# Altium PCB PROC106B_ASCII.PcbDoc (part 5 of 8)
Units mil, origin at the board's own origin, x right, y up, seen from the top; angles counter-clockwise.
Board outline 4498.18 x 1060.53 mil, 8 copper layers (Top Layer, GND1, Sig1, PWR1, PWR2, Sig2, GND2, Bottom Layer), stack 69.602 mil thick; 439 components, 327 nets, 1548 pads, 843 vias.
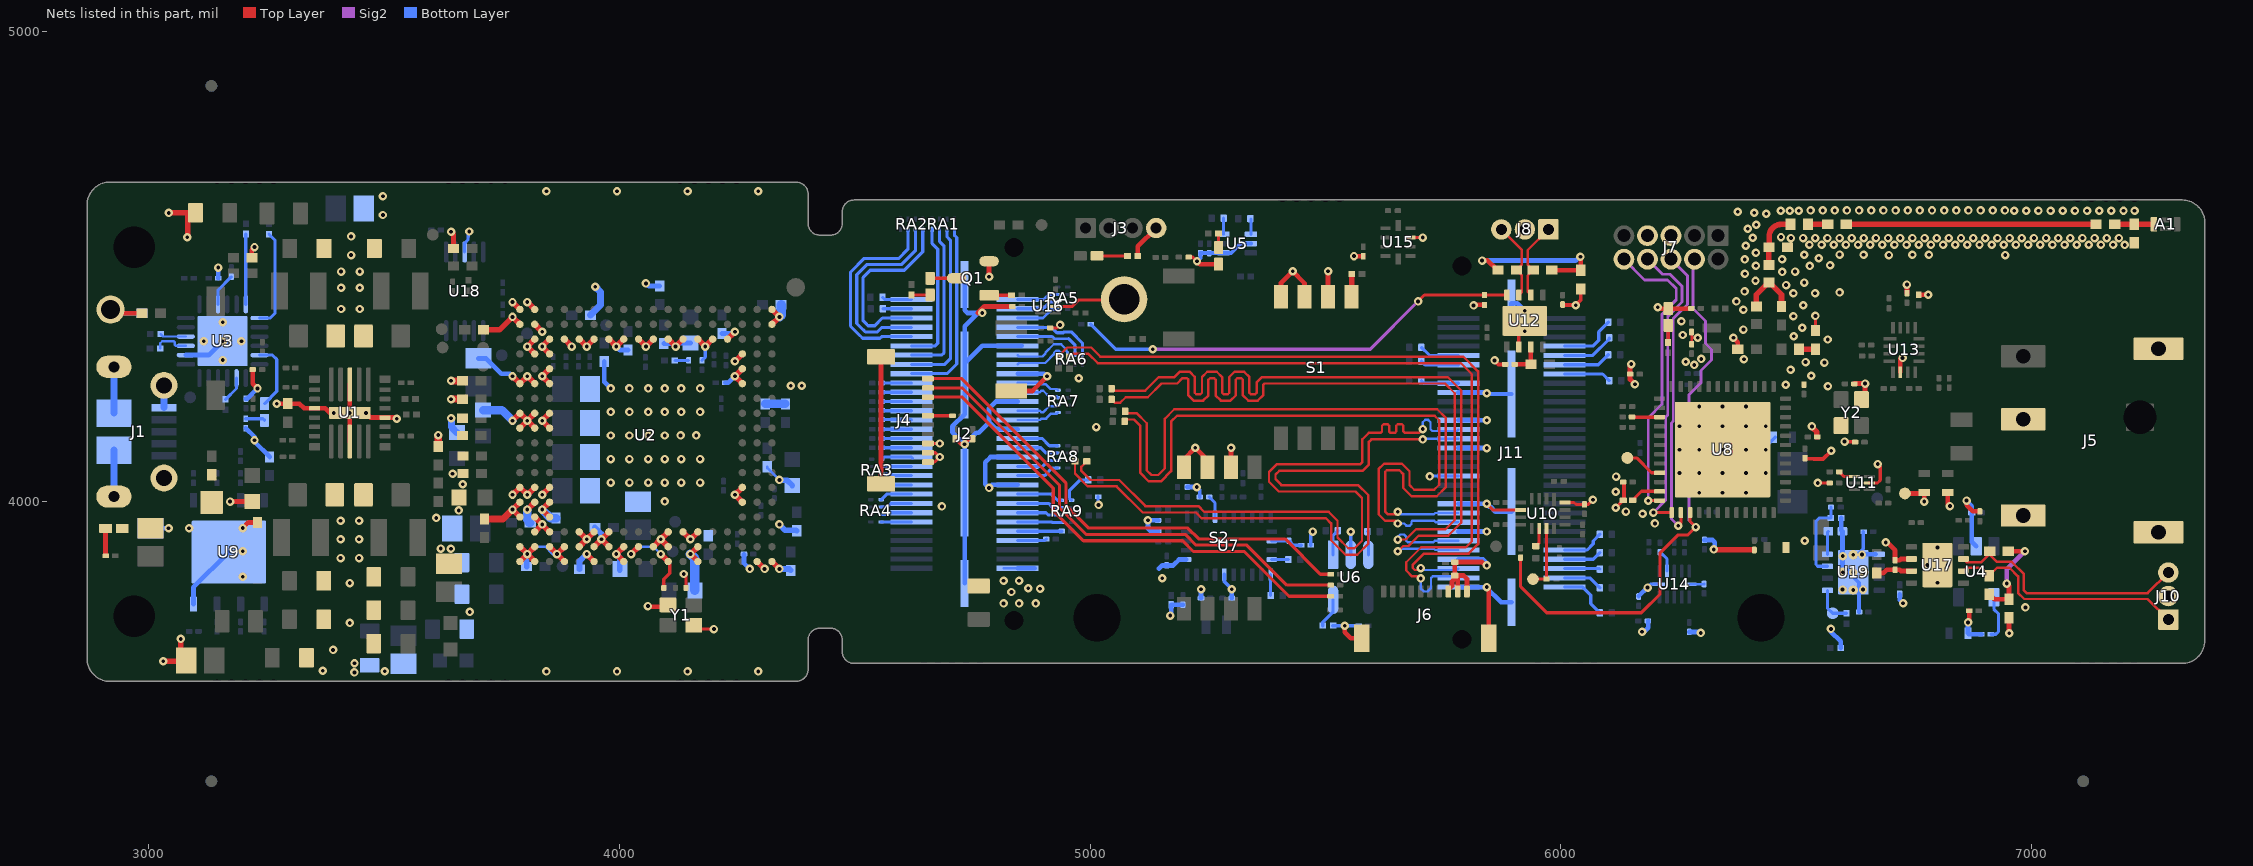
[diagram p11: the nets of this part, all layers, seen from the top]

## Via types
v1: diameter 18, hole 8, Top Layer to Bottom Layer, tented both sides, 804 vias
v2: diameter 19.68, hole 7.87, Top Layer to Bottom Layer, tented both sides, 34 vias
v3: diameter 20, hole 10, Top Layer to Bottom Layer, tented both sides, 3 vias
v4: diameter 18, hole 8, Top Layer to Bottom Layer, 1 vias
v5: diameter 17, hole 7.87, Top Layer to Bottom Layer, 1 vias

## Nets (pads, with @x,y where several pads share a name; then routed paths per layer and width w, separated by ;. In a path a pad name is that pad's centre, name@x,y a point inside that pad or via, vN(x,y) a via of type N, cw(c..) or ccw(c..) an arc to the next point about the centre after c; other vN are vias at no path point) (continued)
GND: C1.1 C2.2 C3.2 C4.2 C5.2 C6.1 C7.2 C8.2 C9.1 C10.1 C11.2 C12.1 C13.1 C14.2 C15.2 C16.2 C17.2 C18.2 C19.2 C20.2 C21.1 C23.2 C24.2 C25.2 C26.2 C27.2 C28.2 C29.2 C30.2 C31.2 C32.2 C33.1 C34.1 C35.2 C36.2 C37.2 C38.2 C39.2 C40.2 C41.2 C42.1 C43.1 C44.1 C45.1 C46.1 C47.1 C48.1 C49.1 C50.2 C51.2 C52.2 C53.2 C54.1 C55.2 C56.2 C57.2 C58.2 C59.2 C60.2 C61.2 C62.2 C63.2 C64.2 C65.2 C66.2 C67.2 C68.2 C69.2 C70.2 C71.2 C72.1 C73.1 C74.2 C75.1 C76.2 C77.1 C78.2 C79.2 C80.2 C81.2 C82.2 C83.2 C84.2 C85.2 C86.2 C87.2 C88.2 C89.2 C90.2 C91.1 C92.1 C94.2 C95.2 C96.2 C97.2 C98.2 C100.1 C101.1 C102.2 C103.2 C104.2 C105.1 C106.1 C107.2 C108.1 C109.1 C110.1 C111.1 C112.2 C113.2 C114.1 C115.2 C116.2 C117.2 C118.2 C119.2 C120.2 C121.2 C122.2 C123.2 C124.1 C125.2 C126.1 C127.2 C128.2 C129.2 C130.1 C131.1 J1.5 J1.6 J1.7 J1.8 J1.9 J1.10 J1.11 J2.20 J2.26 J2.32 J2.38 J2.44 J2.50 J2.MP1 J2.MP2 J2.MP3 J2.MP4 J3.4 J4.8 J4.9 J4.10 J4.11 J4.12 J5.2 J5.3 J5.4 J5.5 J6.8 J6.9 J6.10 J6.11 J6.12 J7.5 J7.7 J8.2 J10.2 J11.18 J11.24 J11.30 J11.36 J11.42 J11.48 J11.54 J11.60 J11.MP1 J11.MP2 J11.MP3 J11.MP4 LD1.2 LD2.2 LD6.2 Q1.2 R3.2 R15.1 R24.1 R29.1 R37.1 R42.2 R52.1 R65.1 R69.1 R73.1 R92.2 R93.2 R96.2 R98.2 R122.2 R125.1 R134.2 R141.2 R158.1 R170.1 R172.1 R180.1 S1.6 S1.7 S1.8 S2.6 S2.7 S2.8 SW2.2 TP12.1 TP15.1 TP20.1 U1.4 U1.11 U1.17 U1.24 U1.27 U2.A1 U2.A2 U2.A6 U2.A8 U2.A11 U2.A13 U2.A15 U2.A17 U2.A18 U2.B6 U2.B8 U2.B9 U2.B10 U2.B11 U2.B12 U2.B13 U2.B14 U2.B15 U2.B16 U2.B17 U2.B18 U2.C6 U2.C7 U2.C8 U2.C12 U2.C13 U2.C14 U2.C16 U2.C17 U2.D16 U2.D17 U2.D18 U2.E3 U2.E16 U2.E17 U2.E18 U2.F3 U2.F16 U2.F17 U2.F18 U2.K16 U2.K17 U2.K18 U2.L16 U2.L17 U2.L18 U2.N3 U2.N16 U2.N17 U2.N18 U2.P3 U2.P16 U2.R3 U2.R16 U2.R17 U2.T4 U2.T5 U2.T6 U2.T7 U2.T8 U2.T9 U2.T10 U2.T11 U2.T12 U2.T13 U2.T14 U2.T15 U2.T16 U2.T17 U2.U1 U2.U17 U2.U18 U2.V1 U2.V17 U2.V18 U3.2 U3.25 U4.2 U5.2 U5.4 U6.2 U7.2 U7.25 U8.49 U9.4 U9.9 U10.6 U10.16 U11.2 U12.2 U12.9@5923.44,4384.46 U13.6 U14.6 U15.3 U16.2 U17.2 U17.9@6799.78,3866 U18.3 U19.5 U19.9@6621.18,3850.46 Y1.2 Y1.4 Y2.2 Y2.4 | length 11299.2
  Top Layer w5.5: C20.2@6277.6,4334.83 6277.6,4349 ; C19.2@6277.6,4361.03 6277.6,4349 ; v1(6290.81,4348.8) 6290.61,4349 6277.6,4349 ; v1@6734.81,4462 v1(6735.03,4461.78) ; v1(6780.09,4440.28) v1@6780.81,4441
  Top Layer w6: C120.2@4915.19,4369.7 4929.78,4369.7 v1(4936.18,4376.1)
  Top Layer w6.7: Y1.4@4159.47,3735.43 4164.9,3730.01 v1(4200.76,3730.01) ; J4.10@4655.33,4084.75 4669.67,4084.75 v1(4680.38,4095.46) 4671.41,4104.44 J4.9@4655.33,4104.44 ; J4.8@4655.33,4124.12 v1(4680.38,4124.12) v1@4680.56,4124.12 ; C16.2@4713.47,4134.05 4725.12,4122.4 v1(4733.36,4122.4) 4744.91,4133.95 C15.2@4750.21,4133.95 ; U16.2@4926.29,4415.28 4962.3,4415.28 4975.97,4428.95 5056.97,4428.95 5056.97,4415.28 TP20.1@5072.16,4430.47 ; R125.1@5209.37,4520.03 5217.97,4520.03 v1(5227,4511) ; U15.3@5680.77,4561.63 v1(5706.58,4561.63) ; v1(5842.34,3996.23) 5842.34,3996.09 5855.35,3983.07 U10.6@5914.31,3983.07 ; U10.16@6008.8,3998.82 6027.93,3998.82 6032.01,3994.74 C117.2@6050.15,3994.74 6058,3994.74 v1(6068,4004.74) ; v1(6116.61,3987.62) C24.2@6132.46,4003.46 ; C21.1@6540.73,4363.78 v1(6540.73,4395.08) ; v1(6545.65,4040.29) C40.2@6571.09,4040.29 ; U11.2@6655.07,4040.29 6672.35,4040.29 6678.29,4046.23 6678.29,4075.35 v1(6673.18,4080.46)
  Top Layer w7: C71.2@4094.48,3817.45 4094.48,3836.09 4106.9,3848.51 4106.9,3867.87 4103.72,3871.04 U2.A8@4103.72,3873.41 ; v1(4136.75,3846.9) 4141.48,3842.17 C14.2@4141.48,3817.27
  Top Layer w8: v1(5299.37,4114.97) v1@5299.37,4116.68 ; v1(5859.11,4300.45) 5867.5,4292.07 C43.1@5881.77,4292.07 ; U12.2@5910.64,4329.34 5910.64,4371.67 U12.9@5923.44,4384.46 ; C105.1@6003.64,4419.31 6004.47,4418.48 6030.47,4418.48 v1(6031.3,4417.65) 6031.3,4417.89 6042.24,4428.83 6042.24,4452.55 C106.1@6042.33,4452.64 ; C26.2@6132.17,4042.21 6132.69,4042.21 6133.86,4041.04 6133.86,4004.87 C24.2@6132.46,4003.46 ; C27.2@6518.42,4093.15 6520.04,4091.53 6536.79,4091.53 6537.06,4091.26 6556.98,4091.26 v1(6574.19,4108.48) ; v1@6602.73,4128.38 v1(6602.58,4128.23) 6603.17,4127.63 6624.26,4127.63 C18.2@6624.86,4127.04
  Top Layer w10: TP12.1@2919.28,4408.64 2927.25,4400.66 C3.2@2986.2,4400.66 ; v1(3173.04,4000.84) C100.1@3220.18,4000.84 ; v1(3200,3944.52) 3211.85,3956.37 C34.1@3231.35,3956.37 ; C32.2@3219.18,4518.49 3219.18,4535.59 v1(3225,4541.42) ; R52.1@3221.07,4281.06 3221.07,4251.35 v1(3231.35,4241.06) ; v1(3272.33,4208.69) C30.2@3295.87,4208.69 3320.4,4208.69 3330.24,4198.85 U1.17@3352.68,4198.85 3375,4198.85 3384.84,4189 v2(3393.23,4189) v2(3427.48,4189) ; U1.24@3427.48,4128.37 v2(3427.48,4189) ; U1.11@3427.48,4249.63 v2(3427.48,4189) ; v1@3526.45,4176.66 3523.96,4179.16 U1.4@3502.28,4179.16 3471.57,4179.16 v2(3461.73,4189) v2(3427.48,4189) ; v1(3642.62,4573.74) 3647.82,4568.54 C31.2@3647.82,4538.34 ; v1@4060.76,3777.29 Y1.2@4095.71,3777.29 ; J4.12@4555.92,4038.49 J4.11@4555.92,4308.18 ; 4761,4401.5 4774.78,4415.28 C72.1@4834.99,4415.28 ; v1(4785.33,4478.19) Q1.2@4785.33,4511.11 ; SW2.2@4832.84,4235.84 4877.59,4235.84 v1(4908.49,4266.74) ; R42.2@5101.31,4522.72 5101.31,4542.78 J3.4@5140.29,4581.75 ; S2.8@5199.37,4073.46 5199.37,4091.17 v1(5223.17,4114.97) 5249.37,4088.77 S2.7@5249.37,4073.46 ; v1(5227,4511) 5232.99,4505.01 LD2.2@5272.84,4505.01 ; S2.6@5299.37,4073.46 v1(5299.37,4114.97) ; S1.8@5405.37,4435.46 5405.37,4465 v1(5430.18,4489.81) 5455.37,4464.63 S1.7@5455.37,4435.46 ; S1.6@5505.37,4435.46 v1(5505.37,4489.81) ; v1(5540.97,3737.11) 5540.97,3723.65 5553.97,3710.65 J6.11@5577.06,3710.65 ; v1(5560.49,4522.26) 5560.83,4521.92 C123.2@5580.17,4521.92 ; J6.8@5761.12,3807.06 5761.12,3813.95 5768.6,3821.44 5768.6,3830.62 5772.77,3834.78 5772.77,3842.77 5773.74,3843.74 C116.2@5774.59,3843.74 ; J6.9@5780.8,3807.06 C116.2@5780.8,3839.39 ; J6.10@5800.49,3810.06 5800.49,3837.09 5793.83,3843.74 5775.3,3843.74 5774.59,3844.45 C115.2@5774.59,3872.2 5833.16,3872.2 5840.17,3865.19 v1(5842.34,3865.19) ; v1(5814.53,4417.41) 5815.67,4418.54 R122.2@5837.64,4418.54 ; v1(5842.34,3819.07) 5846.75,3814.66 J6.12@5846.75,3710.65 ; v1@6146.94,4292 6146.94,4260.11 v1(6157.15,4249.9) ; v1@6206.35,4410.55 LD6.2@6227.85,4410.55 C37.2@6277.18,4410.55 ; v1(6366.4,4348.67) 6375.72,4339.35 C23.2@6375.72,4324.42 ; C17.2@6623.34,4250.88 6623.85,4251.39 6646.11,4251.39 6646.11,4217.48 Y2.4@6646.03,4217.41 ; v1(6689.81,3914) 6693.4,3914 6709.78,3897.62 C108.1@6709.78,3876.02 6719.78,3876 6722.58,3878.8 U17.2@6744.66,3878.8 ; U13.6@6721.06,4275.51 v1@6721.06,4299.75 ; TP15.1@6730.81,4018 6769.81,4018 C122.2@6771.81,4020 v1(6771.81,4000.83) ; C107.2@6735.03,4443.23 v1(6735.03,4461.78) ; R141.2@6760.03,4440.28 v1(6780.09,4440.28) ; C42.1@6821.81,4020 6821.81,3995.69 v1(6826.37,3991.13) ; v1(6861.81,4003) 6861.81,3993.07 6874.85,3980.03 R134.2@6889.73,3980.03 ; v1(6864.78,3744.15) 6867.4,3746.77 C109.1@6867.4,3768.9 ; C110.1@6951.81,3753.93 6951.81,3721.5 v1(6952.41,3720.9) ; v1@6986.5,3776.31 v1(6986.81,3776) ; v1@6721.06,4299.75 6721.06,4304.25 6720.81,4304 6720.81,4300 v1@6721.06,4299.75
  Top Layer w12: v1(3031.17,3661.73) 3068.28,3661.73 v1(3068.28,3709.04) ; v1(3043,4614) 3082.85,4614 3082.85,4566.15 3083,4566 3083,4563 v1(3082,4562) ; C126.1@3721.06,4365.53 3745.45,4365.53 v1(3773.02,4393.1) U2.U18@3788.76,4377.35 ; v1(3773.02,4015.14) U2.F18@3788.76,4030.89 v1(3804.51,4015.14) U2.F17@3820.26,4030.89 ; v1(3773.02,4172.62) U2.L18@3788.76,4188.37 v1(3804.51,4172.62) ; v1(3773.02,4267.11) U2.N18@3788.76,4251.36 v1(3804.51,4267.11) U2.N17@3820.26,4251.36 ; v1(3773.02,4424.59) U2.V18@3788.76,4408.84 ; U2.A18@3788.76,3873.41 v1(3804.51,3889.16) ; U2.B18@3788.76,3904.91 v1(3804.51,3889.16) ; U2.D18@3788.76,3967.9 v1(3773.02,3983.65) U2.E18@3788.76,3999.4 ; U2.K18@3788.76,4156.88 v1(3804.51,4172.62) ; v1(3804.51,3983.65) U2.E17@3820.26,3999.4 ; v1(3804.51,4424.59) U2.V17@3820.26,4408.84 ; U2.A17@3820.26,3873.41 v1(3804.51,3889.16) ; U2.B17@3820.26,3904.91 v1(3804.51,3889.16) ; U2.C17@3820.26,3936.4 v1(3836.01,3952.15) ; U2.D17@3820.26,3967.9 v1(3836.01,3952.15) ; U2.K17@3820.26,4156.88 v1(3804.51,4172.62) ; U2.L17@3820.26,4188.37 v1(3804.51,4172.62) ; U2.R17@3820.26,4314.36 v1(3804.51,4330.1) U2.T17@3820.26,4345.85 ; U2.U17@3820.26,4377.35 v1(3836.01,4361.6) ; v1(3836.01,4015.14) U2.F16@3851.76,4030.89 ; U2.B16@3851.76,3904.91 v1(3867.5,3889.16) ; U2.C16@3851.76,3936.4 v1(3836.01,3952.15) ; U2.D16@3851.76,3967.9 v1(3836.01,3983.65) U2.E16@3851.76,3999.4 ; U2.K16@3851.76,4156.88 v1(3836.01,4172.62) U2.L16@3851.76,4188.37 ; U2.N16@3851.76,4251.36 v1(3836.01,4267.11) U2.P16@3851.76,4282.86 ; U2.R16@3851.76,4314.36 v1(3836.01,4330.1) U2.T16@3851.76,4345.85 ; U2.A15@3883.25,3873.41 v1(3867.5,3889.16) ; U2.B15@3883.25,3904.91 v1(3867.5,3889.16) ; U2.T15@3883.25,4345.85 v1(3899,4330.1) ; U2.B14@3914.75,3904.91 v1(3930.5,3920.65) ; U2.C14@3914.75,3936.4 v1(3930.5,3920.65) ; U2.T14@3914.75,4345.85 v1(3930.5,4330.1) U2.T13@3946.24,4345.85 ; v1(3930.5,3889.16) U2.A13@3946.24,3873.41 ; U2.B13@3946.24,3904.91 v1(3961.99,3920.65) ; U2.C13@3946.24,3936.4 v1(3930.5,3920.65) ; U2.B12@3977.74,3904.91 v1(3961.99,3920.65) ; U2.C12@3977.74,3936.4 v1(3961.99,3920.65) ; U2.T12@3977.74,4345.85 v1(3993.49,4330.1) U2.T11@4009.24,4345.85 ; U2.A11@4009.24,3873.41 v1(3993.49,3889.16) U2.B11@4009.24,3904.91 ; v1(4024.98,3889.16) U2.B10@4040.73,3904.91 ; U2.T10@4040.73,4345.85 v1(4056.48,4330.1) U2.T9@4072.23,4345.85 ; U2.B9@4072.23,3904.91 v1(4087.98,3920.65) ; v1(4087.98,3889.16) U2.A8@4103.72,3873.41 ; U2.B8@4103.72,3904.91 v1(4087.98,3920.65) ; U2.C8@4103.72,3936.4 v1(4087.98,3920.65) ; U2.T8@4103.72,4345.85 v1(4119.47,4330.1) U2.T7@4135.22,4345.85 ; U2.C7@4135.22,3936.4 v1(4150.97,3920.65) U2.C6@4166.72,3936.4 ; U2.A6@4166.72,3873.41 v1(4150.97,3889.16) U2.B6@4166.72,3904.91 ; U2.T6@4166.72,4345.85 v1(4182.46,4330.1) U2.T5@4198.21,4345.85 ; U2.T4@4229.71,4345.85 v1@4243.33,4359.47 ; v1(4245.46,4298.61) U2.R3@4261.2,4314.36 ; U2.E3@4261.2,3999.4 v1(4245.46,4015.14) U2.F3@4261.2,4030.89 ; U2.N3@4261.2,4251.36 v1(4245.46,4267.11) U2.P3@4261.2,4282.86 ; U2.A2@4292.7,3873.41 v1(4308.45,3857.66) ; U2.A1@4324.2,3873.41 v1(4339.94,3857.66) ; U2.U1@4324.2,4377.35 v1(4339.94,4393.1) U2.V1@4324.2,4408.84 ; J4.12@4543.2,4038.49 J4.12@4555.92,4038.49 ; v1(6324.59,3899.2) 6325.24,3898.55 6410.19,3898.55 C86.2@6410.84,3897.89 ; v1(6533.31,4160.3) 6533.31,4158.68 6543.7,4148.29 6543.7,4139.05 6544.53,4138.22 C35.2@6544.67,4138.22
  Top Layer w15: v1(3615.23,4141.98) 3615.31,4141.9 3615.31,4118.19 C33.1@3615.39,4118.11 ; v1(3642.62,4218.19) C58.2@3666.49,4218.19 ; v1(3642.62,4257.19) C57.2@3666.49,4257.19 ; C68.2@3713.57,3963.48 3752.84,3963.48 v1(3773.02,3983.65)
  Bottom Layer w5: v1(3804.51,3889.16) 3820.26,3904.91 3842.53,3904.91 3858.28,3889.16 v1(3867.5,3889.16) ; v1(4024.98,3889.16) 4040.73,3904.91 4072.23,3904.91 v1(4087.98,3889.16)
  Bottom Layer w5.5: C87.2@4314.32,4072.27 C87.2@4314.32,4074.75 ; v1@5840.84,4232.45 v1@5842.34,4230.95
  Bottom Layer w6: C87.2@4314.32,4072.27 v1(4339.95,4046.64) ; v1(6184.15,3818.17) 6184.15,3819.17 6190.34,3825.36 U14.6@6209.55,3825.36
  Bottom Layer w6.7: U18.3@3671.35,4530.99 3671.35,4549.56 3678.49,4556.7 3678.49,4562.64 3679.19,4563.34 3679.19,4572.25 v1(3681.35,4574.41) ; R158.1@4175.56,4300.76 4182.46,4307.66 v1(4182.46,4330.1) ; R37.1@5017.05,4011.07 5017.05,3994.49 v1(5017.88,3993.66) ; v1(5721.24,4054.26) 5722.26,4055.29 J11.36@5782.32,4055.29
  Bottom Layer w8: v1(5226.66,4031.52) 5232.92,4025.26 C13.1@5232.92,4010.48 ; v1(5227,4511) 5234.38,4518.38 C6.1@5234.38,4528.69 C125.2@5252.95,4528.69 5282.89,4528.69 U5.4@5283.23,4529.03 5299.56,4529.03 5319.24,4548.71 U5.2@5341.5,4548.71 ; U7.25@5285.04,3845.7 5285.04,3830.71 v1(5301.01,3814.73) ; R73.1@5468.87,3908 5468.87,3932.94 v1(5472.93,3937) ; R69.1@5516.13,3737.11 v1(5540.97,3737.11) C12.1@5570.91,3737.11 ; U6.2@5553.54,3887.87 v1@5553.54,3935.9 ; v1(5842.34,4230.94) 5843.78,4229.5 J11.MP2@5895.12,4229.5 ; v2(6434.91,4111.11) 6434.91,4117.1 C29.2@6455.28,4137.46 ; U19.9@6611.18,3850.46 6633.26,3828.38 C128.2@6633.26,3766.12 ; U19.9@6630.43,3888.85 6642.17,3900.59 C127.2@6642.17,3936.75
  Bottom Layer w10: TP12.1@2919.28,4408.64 2927.25,4400.66 C2.2@2986.2,4400.66 ; C4.2@3004.01,3943.79 3042.5,3943.79 v1(3042.55,3943.85) ; U3.2@3078.98,4311.9 3127.78,4311.9 v1(3157.31,4341.42) ; U9.4@3095.35,3783.06 3095.35,3818.29 U9.9@3170.35,3893.29 ; R65.1@3147.81,4475.15 v1(3147.81,4497.8) ; R15.1@3206.52,4156.7 3225,4138.23 v1(3225,4131.09) 3225,4127.61 C101.1@3257.08,4095.53 ; R172.1@3206.71,4219.46 3209.74,4219.46 v1(3231.35,4241.06) ; C59.2@3700.56,4304.79 3716.67,4304.79 3749.01,4272.45 3767.67,4272.45 v1(3773.02,4267.11) ; v1@3803.07,3887.72 v1(3804.51,3889.16) ; C130.1@3967.83,4298.36 3967.83,4254.78 v1(3981.48,4241.13) ; v1(3993.49,4330.1) 4001.06,4322.53 C61.2@4018.33,4322.53 ; v1@4018.33,4244.28 v1(4021.48,4241.13) ; v1(4056.48,4464.26) 4062.15,4458.59 C88.2@4085.98,4458.59 ; C96.2@4094.31,4336.45 4113.12,4336.45 v1(4119.47,4330.1) 4126.88,4337.51 C103.2@4150.97,4337.51 ; C91.1@4218.02,4357.96 4241.82,4357.96 v1(4245.46,4361.6) ; R170.1@4224.75,4253.13 4231.48,4253.13 v1(4245.46,4267.11) ; R3.2@4264.78,3889.16 4264.78,3869.84 v1(4276.95,3857.66) ; J2.MP1@4733.36,3826.98 J2.MP2@4733.36,4019.5 v1(4733.36,4122.4) ; J2.MP4@4733.36,4462.02 4733.36,4407.3 4739.16,4401.5 4761,4401.5 ; J2.MP3@4736.75,4297.57 4770.69,4331.51 J2.50@4846.16,4331.51 J2.50@4854.52,4331.51 ; 4761,4400.78 4733.36,4373.14 J2.MP3@4733.36,4269.5 4733.36,4186.13 4707.57,4160.34 4707.57,4148.19 v1(4733.36,4122.4) ; J2.20@4846.16,4036.23 4791.73,4036.23 v1(4785.33,4029.82) 4777.36,4037.79 4777.36,4084.26 4788.39,4095.29 J2.26@4846.16,4095.29 ; J2.32@4846.16,4154.34 4800.11,4154.34 4785.32,4169.13 ; J2.38@4846.16,4213.4 4800.11,4213.4 4785.32,4198.61 4785.32,4169.13 ; J2.44@4846.16,4272.45 4902.77,4272.45 v1(4908.49,4266.74) ; v1(5122.82,3961) 5122.82,3943.75 5128.58,3938 R96.2@5144.96,3938 ; v1(5122.82,3961) R98.2@5144.48,3961 ; 5146.22,3858.44 5152.95,3865.16 C10.1@5162.69,3865.16 5176.2,3865.16 5179.53,3868.48 5179.62,3868.48 5188.83,3877.69 U7.2@5203.84,3877.69 ; v1@5172.1,3758.57 C11.2@5172.1,3781.54 C9.1@5197.1,3781.54 ; R93.2@5206.3,4031.52 v1(5226.66,4031.52) ; C38.2@5235.57,3795.56 v1(5235.57,3814.73) ; C39.2@5301.01,3795.56 v1(5301.01,3814.73) ; J11.60@5782.32,3819.07 5840.84,3819.07 5872.92,3786.98 J11.MP4@5895.12,3786.98 ; J11.54@5782.32,3878.12 5834.41,3878.12 v1@5842.34,3870.19 ; J11.48@5782.32,3937.18 v1@5840.84,3937.18 ; J11.42@5782.32,3996.23 5840.84,3996.23 5847.42,3989.65 5850.7,3989.65 5860.85,3979.5 J11.MP3@5895.12,3979.5 ; J11.30@5782.32,4114.34 v1@5840.84,4114.34 ; J11.24@5782.32,4173.4 v1@5840.84,4173.4 ; J11.18@5782.32,4232.45 v1@5840.84,4232.45 ; 5895.12,4363.6 J11.MP1@5895.12,4422.02 5907.53,4422.02 v2(5923.44,4406.12) ; R180.1@6165.19,3800.17 6183.19,3818.17 v1(6184.15,3818.17) ; v1(6172.42,3724.14) 6176.54,3724.14 6185.59,3733.19 C114.1@6185.59,3747.34 ; C118.2@6272.5,3723.85 6295.09,3723.85 v1(6297.21,3721.73) ; C119.2@6304.91,3919.22 6321.92,3919.22 6326.59,3914.55 v1@6326.59,3899.2 ; v1(6573.56,3730.29) 6573.56,3724.71 6594.25,3704.02 R92.2@6594.25,3689.74 ; R29.1@6595.21,3965.94 6595.21,3940.34 R24.1@6598.09,3937.46 6598.09,3863.56 U19.9@6611.18,3850.46 ; U19.9@6630.43,3888.85 U19.5@6668.27,3888.85 ; C129.2@6719.58,3803.87 6719.58,3791.85 v1(6726.69,3784.74) ; v1(6861.81,4003) 6861.81,4001.72 6872.94,3990.59 C5.2@6872.94,3977 6872.94,3915 U4.2@6882.18,3905.76 ; v1(6864.78,3744.15) C7.2@6864.78,3720.79 6866.57,3719.01 C8.2@6893.18,3719.01 ; v1(4733.36,4122.4) 4757.94,4146.98 4763.16,4146.98 4785.32,4169.13
  Bottom Layer w12: C69.2@3803.07,3862.61 v1@3803.07,3887.72 ; C63.2@3915.38,3856.83 3915.38,3874.05 v1(3930.5,3889.16) ; C64.2@3948.01,3945.83 3961.99,3931.85 v1(3961.99,3920.65) ; v1(3993.49,3889.16) 4001.11,3881.54 C90.2@4001.11,3857.43 C90.2@4001.11,3855.43 ; v1(4339.94,3857.66) 4360.97,3857.66 C94.2@4364,3854.63 ; v1(4339.94,3952.15) 4352.19,3939.9 4375.34,3939.9 C95.2@4376.53,3938.72 ; v1@4348.33,4046 4356.28,4046 C102.2@4367.44,4034.84
  Bottom Layer w15: J1.6@2926.36,4011.35 2926.36,4034.99 J1.7@2926.36,4109.78 ; J1.8@2926.36,4188.52 2926.36,4263.31 ; J1.5@3032.66,4200.33 J1.10@3032.66,4247.58 ; v1(3642.64,4177.66) 3643.22,4177.08 3643.22,4159.64 3645.99,4156.87 3645.99,4155.89 3654.24,4147.64 C83.2@3655.22,4147.64 ; C98.2@3938.33,4396.76 3960.19,4418.63 3960.19,4445.69 v1(3948.76,4457.12)
  Bottom Layer w18: C79.2@3710.6,4195.01 3750.63,4195.01 v1(3773.02,4172.62) ; v1(3804.51,3983.65) 3804.51,3961.8 3807.82,3958.49 3807.82,3956.52 3808.66,3955.68 C67.2@3810.63,3955.68 ; v1(3836.01,3983.65) 3854.19,3965.46 C66.2@3865.49,3965.46 ; C60.2@4309.75,4208.14 C92.1@4352.69,4208.14
  Bottom Layer w19.68: v1(4339.94,4393.1) 4343.63,4396.79 C56.2@4343.63,4419.07
  Bottom Layer w20: v1(4150.97,3889.16) 4160.53,3879.6 C89.2@4160.53,3811.96
  other v1: 3437.24,3637.77 3845,3640 3995,3640 4145,3640 4295,3640 3501.78,3640.53 3370.14,3641.55 3437.41,3657.14 3392.01,3685.56 3427.5,3742.94 5170.1,3758.57 3682.29,3766.43 4060.76,3778.81 6598.2,3813.91 6641.68,3813.91 3427.5,3827.52 5153.05,3837.96 3200,3840.9 6621.18,3850.46 3407.79,3880.66 3447.16,3880.66 6598.73,3884.93 6639.57,3888.2 3200,3895.28 3620.78,3900.91 3642.2,3900.58 6517.93,3917.64 3407.79,3920.66 3447.16,3920.66 5553.54,3936.9 5842.34,3937.18 3086,3944 6199.58,3954.37 3407.79,3960.25 3447.16,3960.25 3611.2,3966.06 6173.42,3975.06 6138.22,3979.46 3658.91,3981.83 4685.21,3990.4 4096.48,4001.13 6116.61,4021.48 3667.38,4037.8 3981.48,4041.13 4021.48,4041.13 4061.48,4041.13 4096.48,4041.13 4131.48,4041.13 4171.48,4041.13 6117.16,4053.82 3645.69,4059.82 3981.48,4091.13 4021.48,4091.13 4061.48,4091.13 4096.48,4091.13 4131.48,4091.13 4171.48,4091.13 5842.34,4114.34 3981.48,4141.13 4021.48,4141.13 4061.48,4141.13 4096.48,4141.13 4130,4141.16 4163.52,4141.2 5012.83,4158.94 5842.34,4173.4 3527.25,4176.66 3981.48,4191.13 4021.48,4191.13 4061.48,4191.13 4096.48,4191.13 4131.48,4191.13 4171.48,4191.13 4061.48,4241.13 4096.48,4241.13 4131.48,4241.13 4171.48,4241.13 6567.18,4245.75 4363.84,4246.9 4387.42,4246.76 6477.81,4248.79 6646.18,4251.46 4975.95,4262.89 6531.81,4268 6487.81,4281 6283.37,4291.04 6149.27,4292.84 6559.81,4296 6519.81,4297.07 6265.28,4297.89 3157.31,4301.42 6388.81,4303 6298.05,4303.82 6725.81,4306 3117.31,4341.42 3197.31,4341.42 6566.81,4345 6494.81,4351.83 6258.88,4354.6 6387.81,4366 6512.81,4370 3157.31,4381.42 6256.1,4383.77 6493.81,4394.36 4771,4401.5 6387.81,4408 3408.97,4409.8 3448.34,4409.8 6205.62,4413.56 6514.81,4418 6372.91,4426 6493.81,4443.5 6539.81,4443.5 6591.81,4445 6390.06,4447.19 3408.97,4454.79 3448.34,4454.79 6478.34,4460.66 6516.81,4466 6413.31,4469.81 6390.89,4484.62 3408.97,4489.38 3448.34,4489.38 6470.39,4488.58 6497.5,4489.4 6528.81,4501.37 6414.18,4501.81 6571.81,4502.89 6390.62,4515.12 6469.81,4515.56 6547.81,4517.37 3430,4524.36 6696.81,4524.37 6943.81,4524.37 6517.09,4524.83 6642.81,4524.83 6746.64,4524.83 6781.79,4524.83 6591.83,4525.52 6414.36,4529.3 6392.81,4544.21 6527.94,4546.17 6553.74,4546.16 6579.54,4546.16 6605.34,4546.16 6631.14,4546.16 6656.94,4546.16 6682.74,4546.16 6708.54,4546.16 6734.34,4546.16 6760.15,4546.16 6785.95,4546.16 6811.75,4546.15 6837.55,4546.15 6863.35,4546.15 6889.15,4546.15 6914.95,4546.15 6940.75,4546.15 6966.55,4546.15 6992.35,4546.15 7018.16,4546.15 7043.96,4546.15 7069.76,4546.15 7095.56,4546.14 7121.36,4546.14 7147.16,4546.14 7172.96,4546.14 7197.56,4546.03 6488.63,4560.48 6514.43,4560.48 6540.23,4560.48 6566.03,4560.48 6591.83,4560.48 6617.64,4560.47 6643.44,4560.47 6669.24,4560.47 6695.04,4560.47 6720.84,4560.47 6746.64,4560.47 6772.44,4560.47 6798.24,4560.47 6824.04,4560.47 6849.84,4560.47 6875.65,4560.46 6901.45,4560.46 6927.25,4560.46 6953.05,4560.46 6978.85,4560.46 7004.65,4560.46 7030.45,4560.46 7056.25,4560.46 7082.05,4560.46 7107.85,4560.45 7133.66,4560.45 7159.46,4560.45 7185.26,4560.45 6407.43,4561.08 6467.49,4562.71 3430,4563.95 6396.81,4580.37 6414.7,4588.53 3497.67,4609.47 6436.24,4611.91 6410.81,4614.37 6375.72,4616.37 6962.81,4618.37 6988.61,4618.37 7014.41,4618.37 7040.21,4618.37 7066.02,4618.37 7091.82,4618.38 7117.62,4618.38 7143.42,4618.38 7169.22,4618.38 7195.02,4618.38 7218.63,4618.38 6466.94,4618.59 6486.08,4618.57 6505.22,4618.56 6530.23,4619.19 6556.03,4619.19 6581.83,4619.19 6607.64,4619.19 6633.44,4619.19 6659.24,4619.19 6685.04,4619.19 6710.84,4619.2 6736.64,4619.2 6762.44,4619.2 6788.24,4619.2 6814.04,4619.2 6839.84,4619.2 6865.65,4619.2 6891.45,4619.2 6917.25,4619.2 6943.05,4619.2 3497.67,4649.07 3845,4660 3995,4660 4145,4660 4295,4660
  other v2: 6621.18,3813.06 6799.78,3828.6 6598.54,3850.46 6643.82,3850.46 6778.13,3866 6821.43,3866 6621.18,3887.86 6799.78,3903.4 6293.77,4019.57 6343.38,4019.57 6392.99,4019.57 6251.84,4061.5 6293.77,4061.5 6343.38,4061.5 6392.99,4061.5 6434.91,4061.5 6251.84,4111.11 6293.77,4111.11 6343.38,4111.11 6392.99,4111.11 6251.84,4160.71 6293.77,4160.71 6343.38,4160.71 6392.99,4160.71 6434.91,4160.71 6293.77,4202.64 6343.38,4202.64 6392.99,4202.64 5923.44,4362.81
HD_AR_BSS_LOGGER: J2.43 RA1.5 | length 392.4
  Bottom Layer w6.7: J2.43@4620.57,4272.45 4695.91,4272.45 4716.55,4293.08 4716.55,4561.64 4711.71,4566.48 RA1.5@4711.71,4578.92
HD_AR_CS1: J2.19 RA3.8 | length 66
  Bottom Layer w6.7: RA3.8@4557.6,4043.61 4564.98,4036.23 J2.19@4620.57,4036.23
HD_AR_DMM_CLK: J2.10 R11.2 | length 93.9
  Bottom Layer w6.7: J2.10@4846.16,3937.81 4939.87,3937.81 R11.2@4940,3937.94
HD_AR_DMM_SYNC: J2.8 R10.2 | length 62
  Bottom Layer w6.7: J2.8@4846.16,3918.12 4904.12,3918.12 R10.2@4907,3921
HD_AR_DP0: J2.27 R88.2 | length 63.3
  Bottom Layer w6.7: R88.2@4557.28,4114.97 J2.27@4620.57,4114.97
HD_AR_DP1: J2.29 R130.2 | length 63.3
  Bottom Layer w6.7: R130.2@4557.28,4134.63 J2.29@4620.54,4134.63
HD_AR_DP2: J2.31 R132.2 | length 63.3
  Bottom Layer w6.7: R132.2@4557.28,4154.34 J2.31@4620.57,4154.34
HD_AR_DP3: J2.33 R133.2 | length 63.6
  Bottom Layer w6.7: R133.2@4557.28,4174.75 4619.84,4174.75 J2.33@4620.57,4174.03
HD_AR_DP4: J2.35 R135.2 | length 63.4
  Bottom Layer w6.7: R135.2@4557.6,4194.78 4558.66,4193.71 J2.35@4620.57,4193.71
HD_AR_DP5: J2.37 R137.2 | length 61.7
  Bottom Layer w6.7: R137.2@4558.99,4213.11 4620.27,4213.11 J2.37@4620.57,4213.4
HD_AR_DP6: J2.39 R138.2 | length 60.7
  Bottom Layer w6.7: R138.2@4559.91,4233.08 J2.39@4620.57,4233.08
HD_AR_DP7: J2.41 R140.2 | length 61.7
  Bottom Layer w6.7: R140.2@4559.05,4252.4 4620.2,4252.4 J2.41@4620.57,4252.77
HD_AR_HOSTINTR1: J2.16 RA9.3 | length 96.7
  Bottom Layer w6.7: J2.16@4846.16,3996.86 4911.7,3996.86 4920.93,3987.64 RA9.3@4939.02,3987.64
HD_AR_MCUCLKOUT: J2.47 RA1.7 | length 337.1
  Bottom Layer w6.7: J2.47@4620.57,4311.82 4684.38,4311.82 4689.75,4317.19 4689.75,4543.29 4680.21,4552.83 RA1.7@4680.21,4578.92
HD_AR_OSC_CLKOUT: J2.45 RA1.6 | length 365.4
  Bottom Layer w6.7: J2.45@4620.57,4292.14 4691.37,4292.14 4703.15,4303.91 4703.15,4556.09 4695.96,4563.28 RA1.6@4695.96,4578.92
HD_AR_PMIC_CLKOUT_SOP2: J2.49 RA1.8 | length 305.1
  Bottom Layer w6.7: J2.49@4620.57,4331.51 4671.19,4331.51 4676.35,4336.67 4676.35,4536.83 4664.47,4548.71 RA1.8@4664.47,4578.92
HD_AR_SCL: J2.55 RA2.5 | length 403.1
  Bottom Layer w6.7: J2.55@4620.57,4390.56 4558.74,4390.56 4542.53,4374.36 4528.16,4374.36 4523.26,4379.26 4523.08,4379.26 4517.69,4384.65 4517.69,4476.95 4532.85,4492.11 4605.41,4492.11 4644.48,4531.18 RA2.5@4644.48,4578.92
HD_AR_SDA: J2.53 RA2.6 | length 422.5
  Bottom Layer w6.7: J2.53@4620.57,4370.88 4558.01,4370.88 4548.08,4360.96 4522.61,4360.96 4517.71,4365.86 4517.53,4365.86 4504.29,4379.1 4504.29,4482.5 4526.45,4504.65 4600.21,4504.65 4628.74,4533.18 RA2.6@4628.74,4578.92
HD_AR_TCK: J2.15 RA4.6 | length 67.9
  Bottom Layer w6.7: RA4.6@4555.92,3988.99 4562.46,3988.99 4564.05,3990.58 4570.71,3990.58 4576.99,3996.86 J2.15@4620.57,3996.86
HD_AR_TDI: J2.11 RA4.8 | length 64.6
  Bottom Layer w6.7: RA4.8@4555.92,3957.49 J2.11@4620.57,3957.49
HD_AR_TDO_SOP0: J2.17 RA4.5 | length 69.5
  Bottom Layer w6.7: RA4.5@4555.92,4004.74 4567.74,4016.55 J2.17@4620.57,4016.55
HD_AR_TMS: J2.13 RA4.7 | length 66.3
  Bottom Layer w6.7: RA4.7@4555.92,3973.24 4565.66,3973.24 4569.6,3977.18 J2.13@4620.57,3977.18
HD_AR_WARMRST: J2.51 RA2.7 | length 440.7
  Bottom Layer w6.7: 4520.18,4517.34 4490.89,4488.05 4490.89,4373.55 4511.98,4352.46 4512.16,4352.46 4517.06,4347.56 4553.63,4347.56 4557.27,4351.19 J2.51@4620.57,4351.19 ; 4520.31,4517.2 4593.34,4517.2 4612.99,4536.85 RA2.7@4612.99,4578.92
HD_SPI_CLK1: J2.21 RA3.7 | length 64.4
  Bottom Layer w6.7: RA3.7@4557.6,4059.36 4577.67,4059.36 4581.11,4055.92 J2.21@4620.57,4055.92
HD_SPI_MISO1: J2.25 RA3.5 | length 68.4
  Bottom Layer w5.5: J2.25@4620.57,4095.29 J2.25@4623.14,4092.71
  Bottom Layer w6.7: RA3.5@4557.6,4090.85 4562.03,4095.29 J2.25@4620.57,4095.29
HD_SPI_MOSI1: J2.23 RA3.6 | length 63.2
  Bottom Layer w6.7: RA3.6@4557.6,4075.11 4558.1,4075.6 J2.23@4620.57,4075.6
INTN: R95.1 TP46.1 U10.11 | length 136.3
  Top Layer w6.7: TP46.1@5940.71,3836.09 R95.1@5969.43,3836.09 U10.11@5969.43,3943.7
JTAG_TCK: J7.8 U8.25 | length 641.4
  Top Layer w6.7: v1(6196.43,3977.5) 6196.69,3977.25 U8.25@6235.11,3977.25
  Sig2 w5.95: J7.8@6183.84,4515.56 6215.86,4483.54 6231.63,4483.54 6256.95,4458.22 6256.95,4424.52 6226.86,4394.43 6226.86,4184.49 6222.79,4180.41 6222.79,4003.85 v1(6196.43,3977.5)
JTAG_TDI: J7.4 R113.1 U8.27 | length 1235.2
  Top Layer w6.7: R113.1@5914.31,3881.68 5914.31,3820.01 5969.79,3764.53 6170.98,3764.53 6210.78,3804.32 6210.78,3892.11 6248.13,3929.46 6268.98,3929.46 v1(6286.18,3946.67) 6274.48,3958.37 U8.27@6274.48,3977.25
  Sig2 w5.95: J7.4@6283.84,4515.56 6285.63,4513.77 6280.73,4513.77 6280.73,4411 6307.28,4384.45 6307.28,4336.71 6319.92,4324.08 6319.92,4301.6 6297.53,4279.21 6297.53,4253.04 6272.1,4227.61 6272.1,3960.75 v1(6286.18,3946.67)
JTAG_TDO: J7.6 U8.26 | length 630.9
  Top Layer w6.7: v1(6249.18,3949.46) 6254.8,3955.08 U8.26@6254.8,3977.25
  Sig2 w5.95: J7.6@6233.84,4515.56 6268.84,4480.56 6268.84,4419.59 6238.75,4389.51 6238.75,4171.9 6234.68,4167.82 6234.68,3963.97 v1(6249.18,3949.46)
JTAG_TMS: J7.10 U8.24 | length 636.5
  Top Layer w6.7: v1(6185.59,4002.46) 6185.97,4002.84 U8.24@6209.52,4002.84
  Sig2 w5.95: J7.10@6133.84,4515.56 6177.75,4471.64 6226.7,4471.64 6245.05,4453.29 6245.05,4429.45 6214.97,4399.36 6214.97,4207.63 6185.59,4178.25 v1(6185.59,4002.46)
MRDY: TP16.1 U8.21 | length 81.4
  Top Layer w6.7: TP16.1@6141.18,4093.46 6160.9,4093.46 6192.47,4061.9 U8.21@6209.52,4061.9
NetA1_4: A1.4 C99.1 C104.1 | length 83.6
  Top Layer w12: C99.1@7176.11,4589.83 C104.1@7217.64,4589.83 A1.4@7259.72,4589.83
NetC8_1: C8.1 U4.4 | length 95.6
  Bottom Layer w6.7: C8.1@6913.21,3719.01 6923.97,3719.01 6929.42,3724.46 6929.42,3762.5 6919.58,3772.33 U4.4@6919.58,3797.49
NetC13_2: C13.2 U7.9 | length 46.9
  Bottom Layer w6.7: C13.2@5252.95,4010.48 5265.35,3998.08 U7.9@5265.35,3968.74
NetC21_2: C21.2 L1.2 | length 34.8
  Top Layer w12: L1.2@6505.92,4324.41 C21.2@6540.73,4324.41
NetC22_1: C22.1 L6.2 L9.1 | length 124
  Top Layer w12: L6.2@6415.18,4415.16 6415.18,4440.34 6440.86,4466.02 L9.1@6441.85,4466.02 ; L9.1@6442.83,4466.02 6468.51,4440.34 C22.1@6468.51,4415.16
NetC24_1: C24.1 U8.23 | length 65.2
  Top Layer w6.7: C24.1@6152.19,4003.46 6171.26,4022.52 U8.23@6209.52,4022.52
NetC41_1: C41.1 L9.2 L10.1 | length 120.7
  Top Layer w12: L9.2@6441.85,4503.42 C41.1@6441.85,4540.91 ; C41.1@6442.24,4540.91 6442.24,4563.52 cw(c6468.46,4563.52) 6468.46,4589.73 6487.76,4589.73 L10.1@6487.76,4589.83
NetC43_2: C43.2 FL12.1 U12.3 | length 71.5
  Top Layer w10: C43.2@5901.79,4292.07 5901.96,4292.24 5936.06,4292.24 FL12.1@5936.23,4292.41 U12.3@5936.23,4329.34
NetC93_1: C93.1 C99.2 | length 528.9
  Top Layer w12: C93.1@6606.06,4589.85 C99.2@7135,4589.69
NetC93_2: C93.2 L10.2 | length 41.5
  Top Layer w12: L10.2@6525.16,4589.83 C93.2@6566.69,4589.83
NetC106_2: C106.2 R119.1 R126.2 | length 345.7
  Top Layer w10: v1(5832.42,4512.62) 5832.96,4513.16 5843.92,4513.16 5864.3,4492.77 R119.1@5866.27,4492.77 ; R126.2@5980.6,4492.48 5980.84,4492.25 6042.09,4492.25 C106.2@6042.33,4492.01 6042.33,4519.71 v1(6041.47,4520.56)
  Bottom Layer w10: v1(5832.42,4512.62) 6031.33,4512.62 6039.28,4520.56 v1(6041.47,4520.56)
NetC108_2: C108.2 FL3.1 U17.3 | length 78.4
  Top Layer w10: FL3.1@6667.81,3855.69 FL3.1@6668.13,3856 ; FL3.1@6670.79,3848.88 6684.78,3848.88 6691.9,3856 C108.2@6709.78,3856 6719.78,3856 6722.58,3853.2 U17.3@6744.66,3853.2
NetC110_2: C110.2 R114.1 R117.2 | length 201.6
  Top Layer w10: R117.2@6909.66,3803.83 6920.2,3793.3 C110.2@6951.81,3793.3 6951.81,3822 v1(6947.13,3826.69) ; R114.1@6950.32,3895.33 v1(6985.56,3895.33)
  Sig2 w10: v1(6947.13,3826.69) 6947.13,3856.9 v1(6985.56,3895.33)
NetD1_2: D1.2 FL2.2
NetJ2_2: J2.2 L16.1 | length 65.4
  Bottom Layer w6: J2.2@4816.76,3859.07 J2.2@4846.16,3859.07
  Bottom Layer w10: J2.2@4846.16,3859.07 J2.2@4882.13,3859.07
  other v1: 4816.08,3784.39 4849.03,3784.39 4884.53,3784.39 4832.84,3808.7 4893.73,3815.76 4868.31,3816.51 4816.08,3832.48 4849.03,3832.48
NetJ2_12: J2.12 RA9.1 | length 93.4
  Bottom Layer w6.7: J2.12@4846.16,3957.49 4918.74,3957.49 4920.09,3956.14 RA9.1@4939.02,3956.14
NetJ2_14: J2.14 RA9.2 | length 95.1
  Bottom Layer w6.7: J2.14@4846.16,3977.18 4906.26,3977.18 4911.55,3971.89 RA9.2@4939.02,3971.89
NetJ2_18: J2.18 RA9.4 | length 98.3
  Bottom Layer w6.7: J2.18@4846.16,4016.55 4917.47,4016.55 4930.63,4003.38 RA9.4@4939.02,4003.38
NetJ2_22: J2.22 RA8.1 | length 91.6
  Bottom Layer w6.7: J2.22@4846.16,4055.92 4903.41,4055.92 4919.74,4072.25 RA8.1@4931.04,4072.25
NetJ2_24: J2.24 RA8.2 | length 90
  Bottom Layer w6.7: J2.24@4846.16,4075.6 4899.11,4075.6 4911.5,4088 RA8.2@4931.04,4088
NetJ2_28: J2.28 RA8.3 | length 89.5
  Bottom Layer w6.7: J2.28@4846.16,4114.97 4895.26,4114.97 4906.48,4103.74 RA8.3@4931.04,4103.74
NetJ2_30: J2.30 RA8.4 | length 91.2
  Bottom Layer w6.7: J2.30@4846.16,4134.66 4898.38,4134.66 4913.55,4119.49 RA8.4@4931.04,4119.49
NetJ2_34: J2.34 RA7.1 | length 92.2
  Bottom Layer w5.1: J2.34@4846.16,4174.03 4893.39,4174.03 4896.38,4177.02 4906.49,4177.02 4916.95,4187.48 4929.14,4187.48 RA7.1@4931.69,4190.03
NetJ2_36: J2.36 RA7.2 | length 93
  Bottom Layer w5.1: J2.36@4846.16,4193.71 4893.39,4193.71 4896.38,4190.72 4900.81,4190.72 4913.32,4203.23 4929.14,4203.23 RA7.2@4931.69,4205.78
NetJ2_40: J2.40 RA7.3 | length 92.8
  Bottom Layer w5.1: J2.40@4846.16,4233.08 4893.39,4233.08 4896.38,4236.08 4900.4,4236.08 4912.4,4224.08 4929.14,4224.08 RA7.3@4931.69,4221.53
NetJ2_42: J2.42 RA7.4 | length 92
  Bottom Layer w5.1: J2.42@4846.16,4252.77 4893.39,4252.77 4896.38,4249.78 4906.07,4249.78 4916.02,4239.82 4929.14,4239.82 RA7.4@4931.69,4237.27
NetJ2_46: J2.46 RA6.1 | length 109.4
  Bottom Layer w5.1: J2.46@4846.16,4292.14 4849.15,4295.13 4904.62,4295.13 4923.39,4313.9 4923.39,4316.3 4928.48,4321.4 4932.71,4321.4 4935.69,4318.41 4935.69,4314.63 RA6.1@4936.59,4313.73
NetJ2_48: J2.48 RA6.2 | length 132.9
  Bottom Layer w5.1: J2.48@4846.16,4311.82 4849.15,4308.83 4898.94,4308.83 4905.21,4315.1 4905.21,4317.51 4922.81,4335.1 4938.38,4335.1 4949.39,4324.09 4949.39,4320.93 4951.44,4318.88 4951.44,4314.63 RA6.2@4952.34,4313.73
NetJ2_52: J2.52 RA6.3 | length 149.6
  Bottom Layer w5.1: 4918.66,4351.19 4919.8,4351.19 4924.09,4346.9 4954.3,4346.9
  Bottom Layer w6.7: J2.52@4846.16,4351.19 4918.66,4351.19 4919.23,4350.63 ; 4954.3,4346.9 4968.09,4333.12 RA6.3@4968.09,4313.73
NetJ2_54: J2.54 RA6.4 | length 176.3
  Bottom Layer w6.7: J2.54@4846.16,4370.88 4917.93,4370.88 4929.31,4359.5 4943.06,4359.5 4944.66,4361.1 4959.77,4361.1 4983.83,4337.03 RA6.4@4983.83,4313.73
NetJ2_56: J2.56 RA5.1 | length 92.2
  Bottom Layer w6.7: J2.56@4846.16,4390.56 4899.92,4390.56 4918.45,4409.09 RA5.1@4930.68,4409.09
NetJ2_57: J2.57 R14.1 | length 60.7
  Bottom Layer w6.7: R14.1@4559.91,4410.25 J2.57@4620.57,4410.25
NetJ2_58: J2.58 RA5.2 | length 90.6
  Bottom Layer w6.7: J2.58@4846.16,4410.25 4900.66,4410.25 4915.25,4424.84 RA5.2@4930.68,4424.84
NetJ2_59: J2.59 R12.1 | length 63.5
  Bottom Layer w6.7: R12.1@4558.95,4434.59 4563.61,4429.93 J2.59@4620.57,4429.93
NetJ2_60: J2.60 RA5.3 | length 88.9
  Bottom Layer w6.7: J2.60@4846.16,4429.93 4901.39,4429.93 4912.05,4440.59 RA5.3@4930.68,4440.59
NetJ4_1: J4.1 R185.2 | length 1055.8
  Top Layer w6.7: J4.1@4655.33,4261.92 4727.18,4261.92 4948.54,4040.55 4948.54,3992.57 4996.72,3944.4 5207.59,3944.4 5230.44,3921.55 5414.12,3921.55 5489.18,3846.49 R185.2@5510.98,3846.49
NetJ4_2: J4.2 R184.2 | length 1057.5
  Top Layer w6.7: J4.2@4655.33,4242.23 4727.91,4242.23 4935.14,4035 4935.14,3987.02 4991.16,3931 5202.04,3931 5224.89,3908.15 5332.96,3908.15 5417.83,3823.28 R184.2@5511.15,3823.28
NetJ4_3: J4.3 R183.2 | length 1058.5
  Top Layer w6.7: J4.3@4655.33,4222.55 4728.65,4222.55 4921.74,4029.45 4921.74,3981.47 4985.61,3917.6 5196.49,3917.6 5219.34,3894.75 5327.41,3894.75 5422.54,3799.62 R183.2@5510.6,3799.62
NetJ4_5: J4.5 R182.2 | length 52.4
  Top Layer w6.7: J4.5@4655.33,4183.18 R182.2@4707.7,4183.18
NetJ8_1: J8.1 R126.1 U12.6 | length 169.8
  Top Layer w5.2: U12.6@5936.23,4439.58 5929.61,4446.2 5929.61,4480.86 R126.1@5941.23,4492.48 5929.61,4504.11 5929.61,4535.06 J8.1@5973.44,4578.88
NetJ8_3: J8.3 R119.2 U12.7 | length 169.8
  Top Layer w5.2: J8.3@5873.44,4578.88 5917.26,4535.06 5917.26,4504.39 R119.2@5905.64,4492.77 5917.26,4481.15 5917.26,4446.2 U12.7@5910.64,4439.58
NetJ10_1: J10.1 R117.1 U17.6 | length 518.2
  Top Layer w5.2: U17.6@6854.9,3853.2 6861.52,3859.83 6893.28,3859.83 6909.66,3843.44 R117.1@6909.66,3843.2 6926.69,3860.23 6952.6,3860.23 6971.1,3841.73 6971.1,3806.84 6984.11,3793.82 7246.4,3793.82 J10.1@7290.23,3750
NetJ10_3: J10.3 R114.2 U17.7 | length 519.1
  Top Layer w5.2: U17.7@6854.9,3878.8 6861.52,3872.18 6893.28,3872.18 6909.57,3888.47 6909.57,3889.61 6926.6,3872.58 6957.72,3872.58 6983.45,3846.85 6983.45,3811.96 6989.23,3806.18 7246.4,3806.18 J10.3@7290.23,3850
NetJ11_7: J11.7 R150.1 | length 124.3
  Bottom Layer w6.7: J11.7@6007.91,4330.88 6067.62,4330.88 6080.27,4343.52 6080.27,4361.21 R150.1@6100.82,4381.76
NetJ11_9: J11.9 R151.1 | length 111.6
  Bottom Layer w6.7: J11.9@6007.91,4311.19 6067.76,4311.19 6102.62,4346.05 R151.1@6102.62,4348.48
NetJ11_10: J11.10 R152.2 | length 85.7
  Bottom Layer w6.7: R152.2@5703.72,4328.4 5720.93,4311.19 J11.10@5782.32,4311.19
NetJ11_11: J11.11 R153.1 | length 101.3
  Bottom Layer w6.7: J11.11@6007.91,4291.51 6079.44,4291.51 R153.1@6100.53,4312.59
NetJ11_12: J11.12 R154.2 | length 81.7
  Bottom Layer w6.7: R154.2@5703.72,4298.93 5711.14,4291.51 J11.12@5782.32,4291.51
NetJ11_13: J11.13 R155.1 | length 100.7
  Bottom Layer w6.7: J11.13@6007.91,4271.82 6088.51,4271.82 R155.1@6102.76,4257.57
NetJ11_16: J11.16 R157.2 | length 80.9
  Bottom Layer w6.7: R157.2@5703.72,4257.72 5709.31,4252.14 J11.16@5782.32,4252.14
NetJ11_26: J11.26 R142.2 | length 1605
  Top Layer w5.1: R142.2@4992.71,4085.96 4981.47,4074.71 4981.47,4065.91 5000.74,4046.64 5061.89,4046.64 5117.3,3991.23 5230.19,3991.23 5242.49,3978.93 5506.79,3978.93 5525.53,3960.18 5525.53,3924.37 5548.32,3901.58 5561.57,3901.58 5577.38,3917.4 5577.38,4008.41 5563.64,4022.15 5400.57,4022.15 5379.97,4042.75 5379.97,4063.65 5395.98,4079.66 5573.04,4079.66 5578.42,4085.05 5578.42,4133.29 5591.7,4146.57 5614,4146.57 5617.03,4146.57 5620.05,4149.59 5620.05,4161.86 5623.07,4164.88 5632.13,4164.88 5635.15,4161.86 5635.15,4149.59 5638.17,4146.57 5647.23,4146.57 5650.25,4149.59 5650.25,4161.86 5653.27,4164.88 5662.33,4164.88 5665.35,4161.86 5665.35,4149.59 5668.37,4146.57 5680.45,4146.57 5688,4146.57 5698.28,4146.57 v1(5706.58,4154.87) ; R142.2@4992.84,4085.84 R142.2@4994,4087
  Bottom Layer w5.1: v1(5706.58,4154.87) 5706.58,4169.11 5711.8,4174.33 5717.99,4174.33 5722.99,4169.33 5722.99,4154.5 5726.78,4150.72 5779.33,4150.72 J11.26@5782.32,4153.71
NetJ11_28: J11.28 R143.2 | length 1523.3
  Top Layer w5.1: R143.2@4967.77,4085.96 4967.77,4060.23 4995.06,4032.94 5056.22,4032.94 5111.62,3977.53 5224.51,3977.53 5236.82,3965.23 5501.12,3965.23 5511.83,3954.51 5511.83,3918.7 5542.65,3887.88 5567.24,3887.88 5591.08,3911.73 5591.08,4014.08 5569.32,4035.85 5406.24,4035.85 5393.67,4048.42 5393.67,4057.98 5401.65,4065.96 5578.71,4065.96 5592.12,4079.37 5592.12,4127.61 5597.37,4132.87 v1(5706.58,4132.87)
  Bottom Layer w5.1: v1(5706.58,4132.87) 5707.74,4134.03 J11.28@5782.32,4134.03
NetJ11_44: J11.44 R144.2 | length 1497.2
  Top Layer w5.1: R144.2@5074.38,4192.66 5078.25,4188.79 5098.82,4188.79 5120.42,4167.19 5120.42,4067.08 5130.29,4057.21 5144.56,4057.21 5158.4,4071.06 5158.4,4176.46 5178.82,4196.88 5737.33,4196.88 5755.13,4179.07 5755.13,4030.95 5736.32,4012.13 5682.72,4012.13 5664.75,4030.11 5664.75,4059.58 5656.87,4067.45 5629.99,4067.45 5626.58,4064.04 5626.58,3979.62 5632.65,3973.55 v1@5648.39,3973.55 ; v1@5648.2,3973.74 v1(5653.67,3979.2)
  Bottom Layer w5.1: v1(5653.67,3979.2) 5659.32,3973.55 5730.04,3973.55 5733.03,3976.55 J11.44@5782.32,3976.55
NetJ11_46: J11.46 R145.2 | length 1504.8
  Top Layer w5.1: R145.2@5073.28,4171.22 5077.14,4175.09 5093.14,4175.09 5106.72,4161.52 5106.72,4061.4 5124.61,4043.51 5150.23,4043.51 5172.1,4065.38 5172.1,4170.79 5184.5,4183.18 5731.65,4183.18 5741.43,4173.4 5741.43,4036.62 5730.64,4025.83 5688.4,4025.83 5678.45,4035.78 5678.45,4065.25 5662.55,4081.15 5624.32,4081.15 5612.88,4069.72 5612.88,3973.95 5626.98,3959.85 5647.7,3959.85 v1@5653.67,3953.89
  Bottom Layer w5.1: v1(5653.67,3954.2) 5667.21,3954.2 5671.64,3949.77 5679.08,3949.77 5682.59,3953.28 5682.59,3957.95 5684.49,3959.85 5730.75,3959.85 5733.75,3956.86 J11.46@5782.32,3956.86
NetJ11_50: J11.50 R146.2 | length 1543.1
  Top Layer w5.1: R146.2@5045.59,4217.79 5052.35,4211.04 5064.14,4211.04 5075.54,4222.44 5122.54,4222.44 5151.56,4251.46 5184.94,4251.46 5196.54,4263.06 5205.36,4263.06 5208.6,4259.82 5208.6,4226.36 5219.86,4215.1 5240.04,4215.1 5251.3,4226.36 5251.3,4259.6 5254.54,4262.84 5263.36,4262.84 5266.6,4259.6 5266.6,4226.36 5277.86,4215.1 5298.04,4215.1 5309.3,4226.36 5309.3,4259.6 5312.54,4262.84 5321.36,4262.84 5324.6,4259.6 5324.6,4226.36 5335.86,4215.1 5356.04,4215.1 5367.3,4226.36 5367.3,4248.23 5370.54,4251.46 5754.07,4251.46 5774.59,4230.94 5774.59,3961.67 5754.79,3941.87 5692.17,3941.87 5670.45,3920.15 v1(5653.67,3920.15)
  Bottom Layer w5.1: v1(5653.67,3920.15) 5653.67,3925.88 5658.7,3930.92 5666.92,3930.92 5671.19,3926.64 5671.19,3918.07 5674.77,3914.5 5729.2,3914.5 5732.19,3917.49 J11.50@5782.32,3917.49
NetJ11_51: J11.51 R186.1 | length 92.4
  Bottom Layer w6.7: J11.51@6007.91,3897.81 6055.63,3897.81 6068.62,3910.8 6068.62,3917.09 R186.1@6082.75,3931.22
NetJ11_52: J11.52 R147.2 | length 1570.3
  Top Layer w5.1: R147.2@5045.59,4240.79 5050.24,4236.14 5116.87,4236.14 5145.89,4265.16 5179.27,4265.16 5190.86,4276.76 5211.04,4276.76 5222.3,4265.5 5222.3,4232.04 5225.54,4228.8 5234.36,4228.8 5237.6,4232.04 5237.6,4265.27 5248.86,4276.54 5269.04,4276.54 5280.3,4265.27 5280.3,4232.04 5283.54,4228.8 5292.36,4228.8 5295.6,4232.04 5295.6,4265.27 5306.86,4276.54 5327.04,4276.54 5338.3,4265.27 5338.3,4232.04 5341.54,4228.8 5350.36,4228.8 5353.6,4232.04 5353.6,4253.9 5364.86,4265.16 5759.75,4265.16 5788.29,4236.62 5788.29,3956 5760.46,3928.17 5697.84,3928.17 5690.57,3920.9 5676.12,3906.45 5664.97,3906.45 v1(5653.67,3895.15)
  Bottom Layer w5.1: v1(5653.67,3895.15) 5659.32,3900.8 5729.95,3900.8 5732.94,3897.81 J11.52@5782.32,3897.81
NetJ11_53: J11.53 R187.1 | length 80.7
  Bottom Layer w6.7: J11.53@6007.91,3878.12 6068.61,3878.12 R187.1@6082.75,3892.26
NetJ11_55: J11.55 R188.1 | length 75.3
  Bottom Layer w6.7: J11.55@6007.91,3858.44 6081.73,3858.44 R188.1@6082.75,3857.41
NetJ11_56: J11.56 R148.2 | length 1558.8
  Top Layer w5.1: R148.2@4932.76,4309.41 4940.74,4317.39 4940.74,4317.51 4946.33,4323.1 4946.45,4323.1 4951.41,4328.06 5002.21,4328.06 5021.81,4308.46 5792.97,4308.46 5824.19,4277.23 5824.19,3910.48 5803.86,3890.15 5708.91,3890.15 5685.03,3866.26 5685.03,3860.1 5689.68,3855.44 5697.91,3855.44 v1(5702.06,3859.59)
  Bottom Layer w5.1: v1(5702.06,3859.59) 5706.21,3855.44 J11.56@5779.33,3855.44 ; J11.56@5779.33,3855.44 J11.56@5782.32,3858.44 J11.56@5779.33,3855.44
NetJ11_57: J11.57 R189.1 | length 83.6
  Bottom Layer w6.7: J11.57@6007.91,3838.75 6061.56,3838.75 R189.1@6082.75,3817.56
NetJ11_58: J11.58 R149.2 | length 1577.7
  Top Layer w5.1: R149.2@4956.17,4308.66 4961.86,4314.36 4996.54,4314.36 5016.13,4294.76 5787.29,4294.76 5810.49,4271.56 5810.49,3916.15 5798.19,3903.85 5703.24,3903.85 5671.33,3871.93 5671.33,3854.43 5684.01,3841.74 5697.91,3841.74 v1(5702.06,3837.59)
  Bottom Layer w5.1: v1(5702.06,3837.59) 5702.06,3836.59 5702.06,3816.44 5708.83,3809.68 5716.42,3809.68 5724.03,3817.29 5724.03,3838.14 5727.64,3841.74 J11.58@5779.33,3841.74 ; J11.58@5779.33,3841.74 J11.58@5782.32,3838.75 J11.58@5779.33,3841.74
NetJ11_59: J11.59 R190.1 | length 107.9
  Bottom Layer w6.7: J11.59@6007.91,3819.07 6046.09,3819.07 6063.24,3801.92 6063.24,3784.04 R190.1@6082.75,3764.53
NetLD1_1: LD1.1 R39.2 | length 58.5
  Top Layer w10: LD1.1@2908.64,3943.79 2908.64,3886.21 R39.2@2909.26,3885.59
NetLD2_1: LD2.1 R13.2 | length 30.2
  Top Layer w6.7: LD2.1@5272.84,4540.44 R13.2@5272.84,4570.64
NetLD3_2: LD3.2 R42.1 | length 64.5
  Top Layer w6.7: LD3.2@5014.74,4522.72 R42.1@5079.26,4522.72
NetLD4_1: LD4.1 U3.17 | length 145.2
  Bottom Layer w6.7: U3.17@3235.64,4311.9 3263.27,4311.9 3272.33,4302.84 3272.33,4234.73 LD4.1@3246.44,4208.84
NetLD4_2: LD4.2 R15.2 | length 41.3
  Bottom Layer w6.7: R15.2@3206.52,4176.73 3243.12,4176.73 LD4.2@3246.44,4173.41
NetLD5_1: LD5.1 R107.2 | length 39.5
  Top Layer w6.7: R107.2@4620.57,4439.65 LD5.1@4660.11,4439.65
NetLD5_2: LD5.2 Q1.3 | length 56.2
  Top Layer w6.7: LD5.2@4660.11,4475.09 Q1.3@4716.29,4475.09
NetLD6_1: LD6.1 R17.2 | length 36.5
  Top Layer w6.7: R17.2@6227.85,4338.67 LD6.1@6227.85,4375.12
NetQ1_1: Q1.1 R108.2 | length 47.6
  Top Layer w6.7: Q1.1@4785.33,4439.06 R108.2@4832.96,4439.06
NetR2_1: R2.1 R174.1 | length 29.3
  Bottom Layer w6.7: R2.1@4117.94,4300.76 R174.1@4147.23,4300.76
NetR16_2: R16.2 S1.5 | length 49
  Top Layer w12: S1.5@5555.37,4435.46 R16.2@5555.37,4484.46
NetR20_2: R20.2 R29.2 U19.3 | length 175.3
  Bottom Layer w6.7: U19.3@6566.06,3863.26 6545.65,3863.26 6541.75,3867.15 6541.75,3959.03 6548.66,3965.94 R29.2@6573.16,3965.94 6573.66,3966.44 R20.2@6573.66,3988.94
NetR24_2: R24.2 U19.4 | length 50.4
  Bottom Layer w5.5: U19.4@6566.06,3888.6 U19.4@6566.91,3888.6
  Bottom Layer w6.7: U19.4@6566.06,3888.85 6566.06,3935.25 R24.2@6568.28,3937.46
NetR27_2: R27.2 TP10.1 U19.1 | length 82.5
  Bottom Layer w6.7: U19.1@6566.06,3812.08 6566.06,3774.58 TP10.1@6577.18,3763.46 6577.29,3763.57 R27.2@6606.39,3763.57
NetR30_2: R30.2 U10.10 | length 40.3
  Top Layer w6.7: R30.2@5946.67,3906.31 5953.68,3913.33 U10.10@5953.68,3943.7
NetR40_2: R40.2 U3.9 | length 70.1
  Bottom Layer w6.7: U3.9@3147.47,4419.75 3147.47,4449.8 R40.2@3175.78,4478.12
NetR41_1: R41.1 U3.3 | length 73.8
  Bottom Layer w5: R41.1@3024.94,4326.25 3024.94,4337.12 3029.08,4341.27 3053.43,4341.27 3055.31,4339.38 3055.31,4333.93 3057.67,4331.58 U3.3@3078.98,4331.58
NetR51_2: R51.2 U5.1 | length 32.4
  Bottom Layer w5.5: U5.1@5341.5,4568.4 U5.1@5341.64,4568.54
  Bottom Layer w6.7: U5.1@5341.5,4568.4 R51.2@5341.5,4600.58
NetR57_2: R57.2 U5.6 | length 34.4
  Bottom Layer w5.5: U5.6@5283.23,4568.4 U5.6@5283.59,4568.76
  Bottom Layer w6.7: U5.6@5283.59,4568.76 R57.2@5283.59,4602.69
NetR58_2: R58.2 RA9.5 | length 72.3
  Bottom Layer w6.7: RA9.5@4960.68,4003.38 4956,4008.06 4956,4024 4978.94,4046.94 R58.2@4996.2,4046.94
NetR60_1: R60.1 U3.4 | length 55.6
  Bottom Layer w5: R60.1@3025.57,4356.6 3030.91,4351.27 U3.4@3078.98,4351.27
NetR61_2: R61.2 U3.20 | length 55
  Bottom Layer w6.7: R61.2@3163.55,4217.78 3186.84,4241.06 U3.20@3186.84,4263.09
NetR62_2: R62.2 U3.12 | length 149.4
  Bottom Layer w6.7: U3.12@3206.52,4419.75 R62.2@3206.51,4569.19
NetR63_2: R63.2 U3.13 | length 210.4
  Bottom Layer w6.7: U3.13@3235.64,4390.64 3258.76,4390.64 3268.29,4400.17 3268.29,4556.37 R63.2@3255.87,4568.78
NetR66_2: R66.2 R122.1 U12.8 | length 953.3
  Top Layer w6.7: v1(5696.52,4426) 5710.07,4439.58 R122.1@5837.64,4439.58 U12.8@5885.05,4439.58
  Sig2 w6.7: v1(5132.78,4324.44) 5594.96,4324.44 v1(5696.52,4426)
  Bottom Layer w6.7: R66.2@5001.44,4377.56 5054.55,4324.44 v1(5132.78,4324.44)
NetR67_2: R67.2 U6.1 | length 55.2
  Bottom Layer w6.7: U6.1@5516.13,3887.87 5516.13,3928.91 R67.2@5526.13,3938.91
NetR68_2: R68.2 U6.3 | length 53.7
  Bottom Layer w5.5: R68.2@5590.94,3935.21 R68.2@5590.94,3938.91
  Bottom Layer w6.7: R68.2@5589.08,3937.06 5590.94,3935.21 U6.3@5590.94,3887.87
NetR69_2: R69.2 U6.5 | length 64.2
  Bottom Layer w6.7: R69.2@5494.09,3737.11 5494.09,3744.51 5516.13,3766.56 U6.5@5516.13,3792.16
NetR70_1: R70.1 U7.19 | length 35.3
  Bottom Layer w6.7: U7.19@5385.92,3877.69 R70.1@5421.2,3877.69
NetR71_1: R71.1 U7.20 | length 44.4
  Bottom Layer w6.7: R71.1@5383.46,3801.26 U7.20@5383.46,3845.7
NetR72_2: R72.2 R73.2 U7.17 | length 66.8
  Bottom Layer w6.7: U7.17@5385.92,3917.06 5422.6,3917.06 R72.2@5422.76,3917.23 5431.98,3908 R73.2@5448.84,3908
NetR74_2: R74.2 U11.4 | length 36.5
  Top Layer w6.7: R74.2@6591.11,4063.92 6600.96,4054.07 U11.4@6623.57,4054.07
NetR76_1: R76.1 U14.8 | length 46.5
  Bottom Layer w6.7: R76.1@6210.78,3893.43 6225.29,3878.92 U14.8@6225.29,3852.92
NetR79_1: R79.1 U14.12 | length 29.7
  Bottom Layer w5.5: U14.12@6274.51,3825.36 6303.81,3825.36 R79.1@6304.11,3825.66
NetR86_2: R86.2 U8.15 | length 58.7
  Top Layer w6.7: R86.2@6151.04,4180.57 6151.61,4180.01 U8.15@6209.52,4180.01